# Altium PCB CH32L103C8T-R0.PcbDoc
Units mil, origin at the board's own origin, x right, y up, seen from the top; angles counter-clockwise.
Board outline 2283.48 x 2204.72 mil, 2 copper layers (Top Layer, Bottom Layer); 54 components, 62 nets, 247 pads, 390 vias.
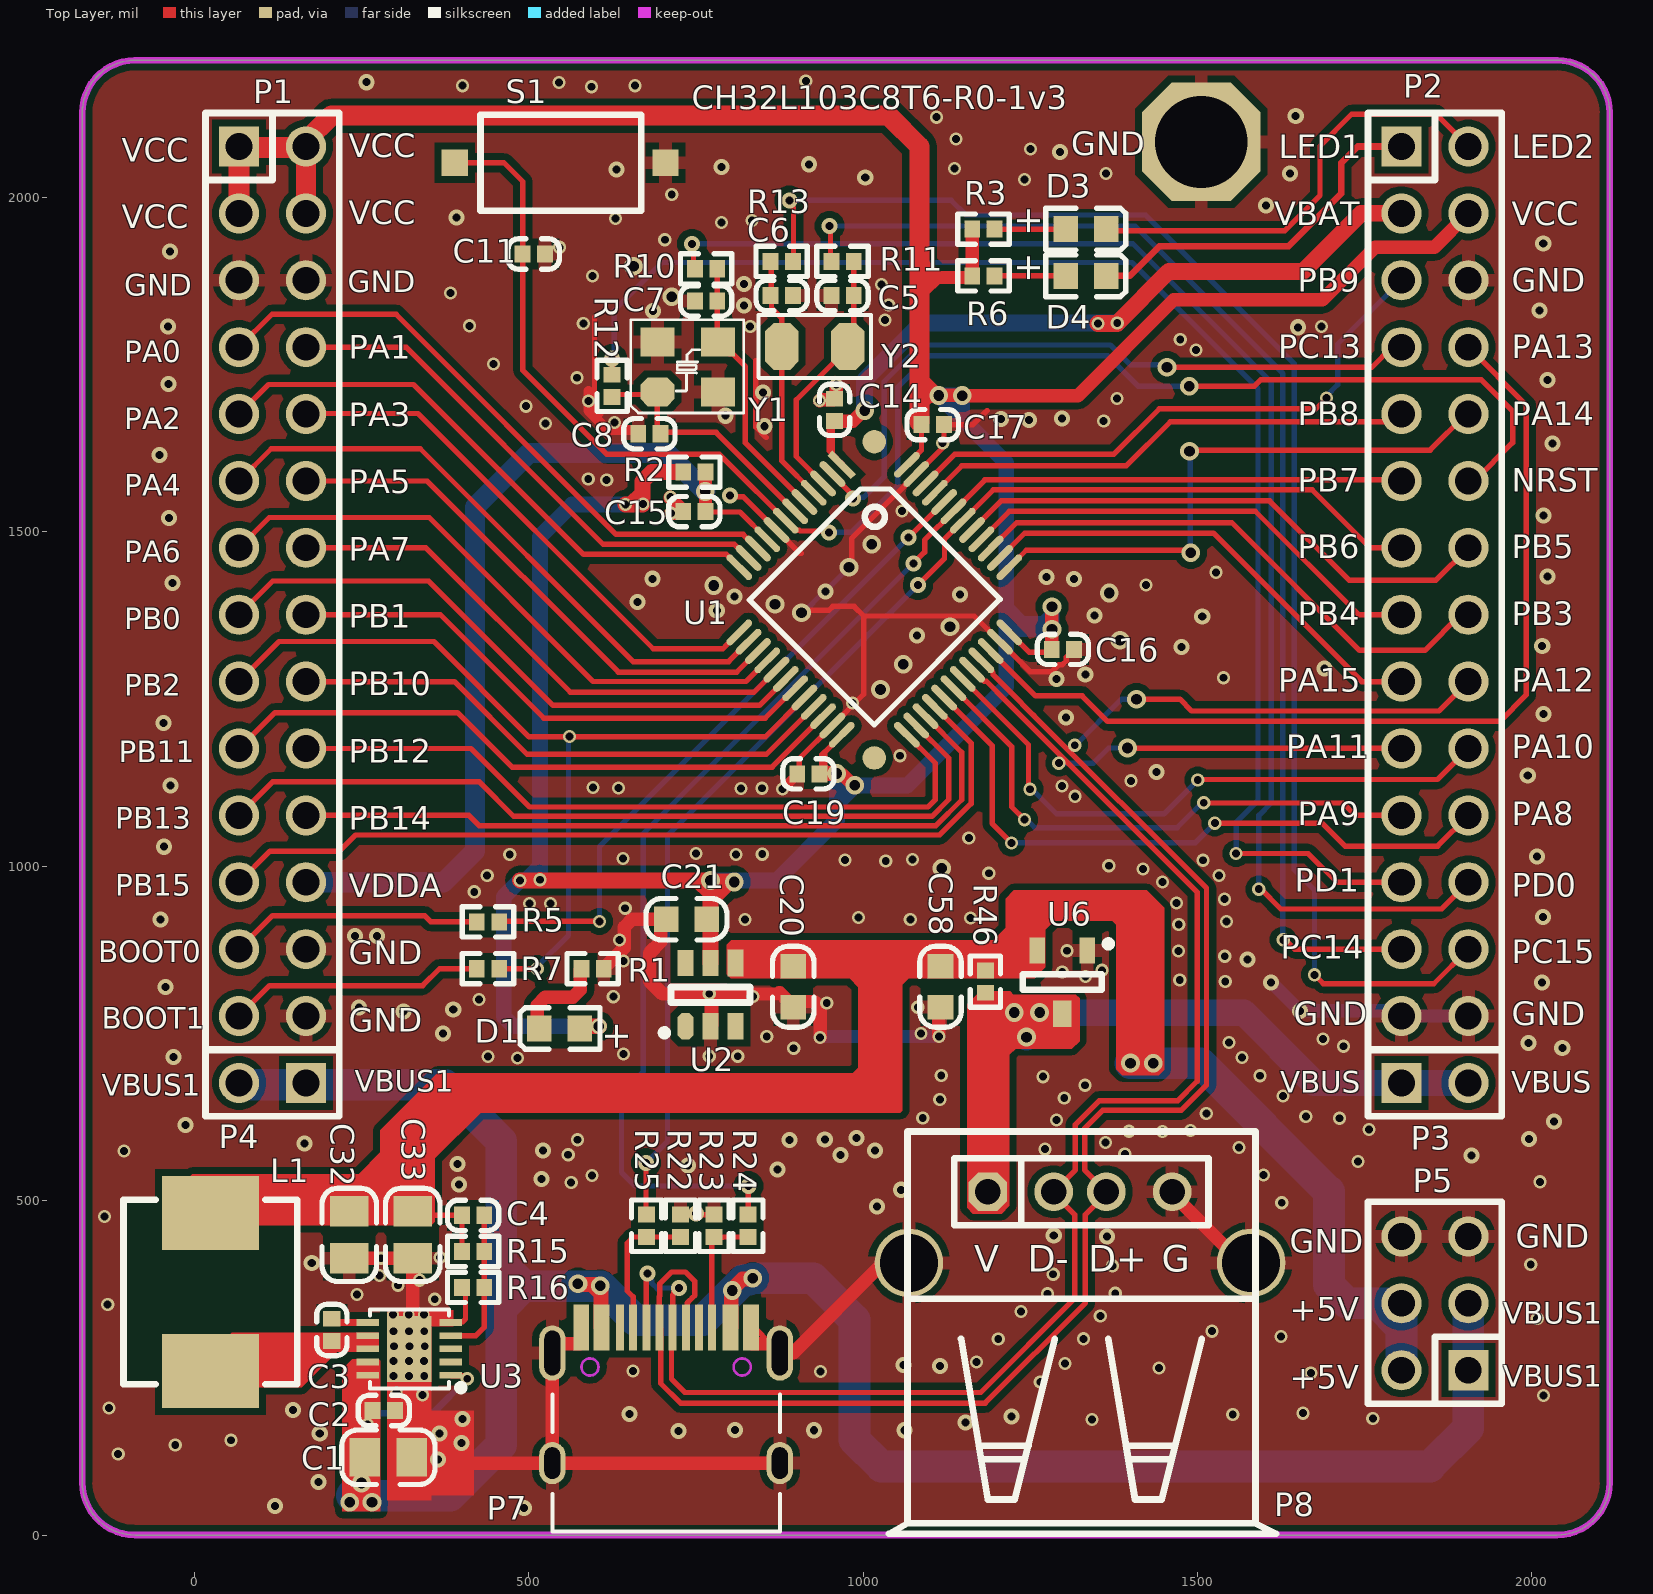
[diagram p0: Top Layer view]
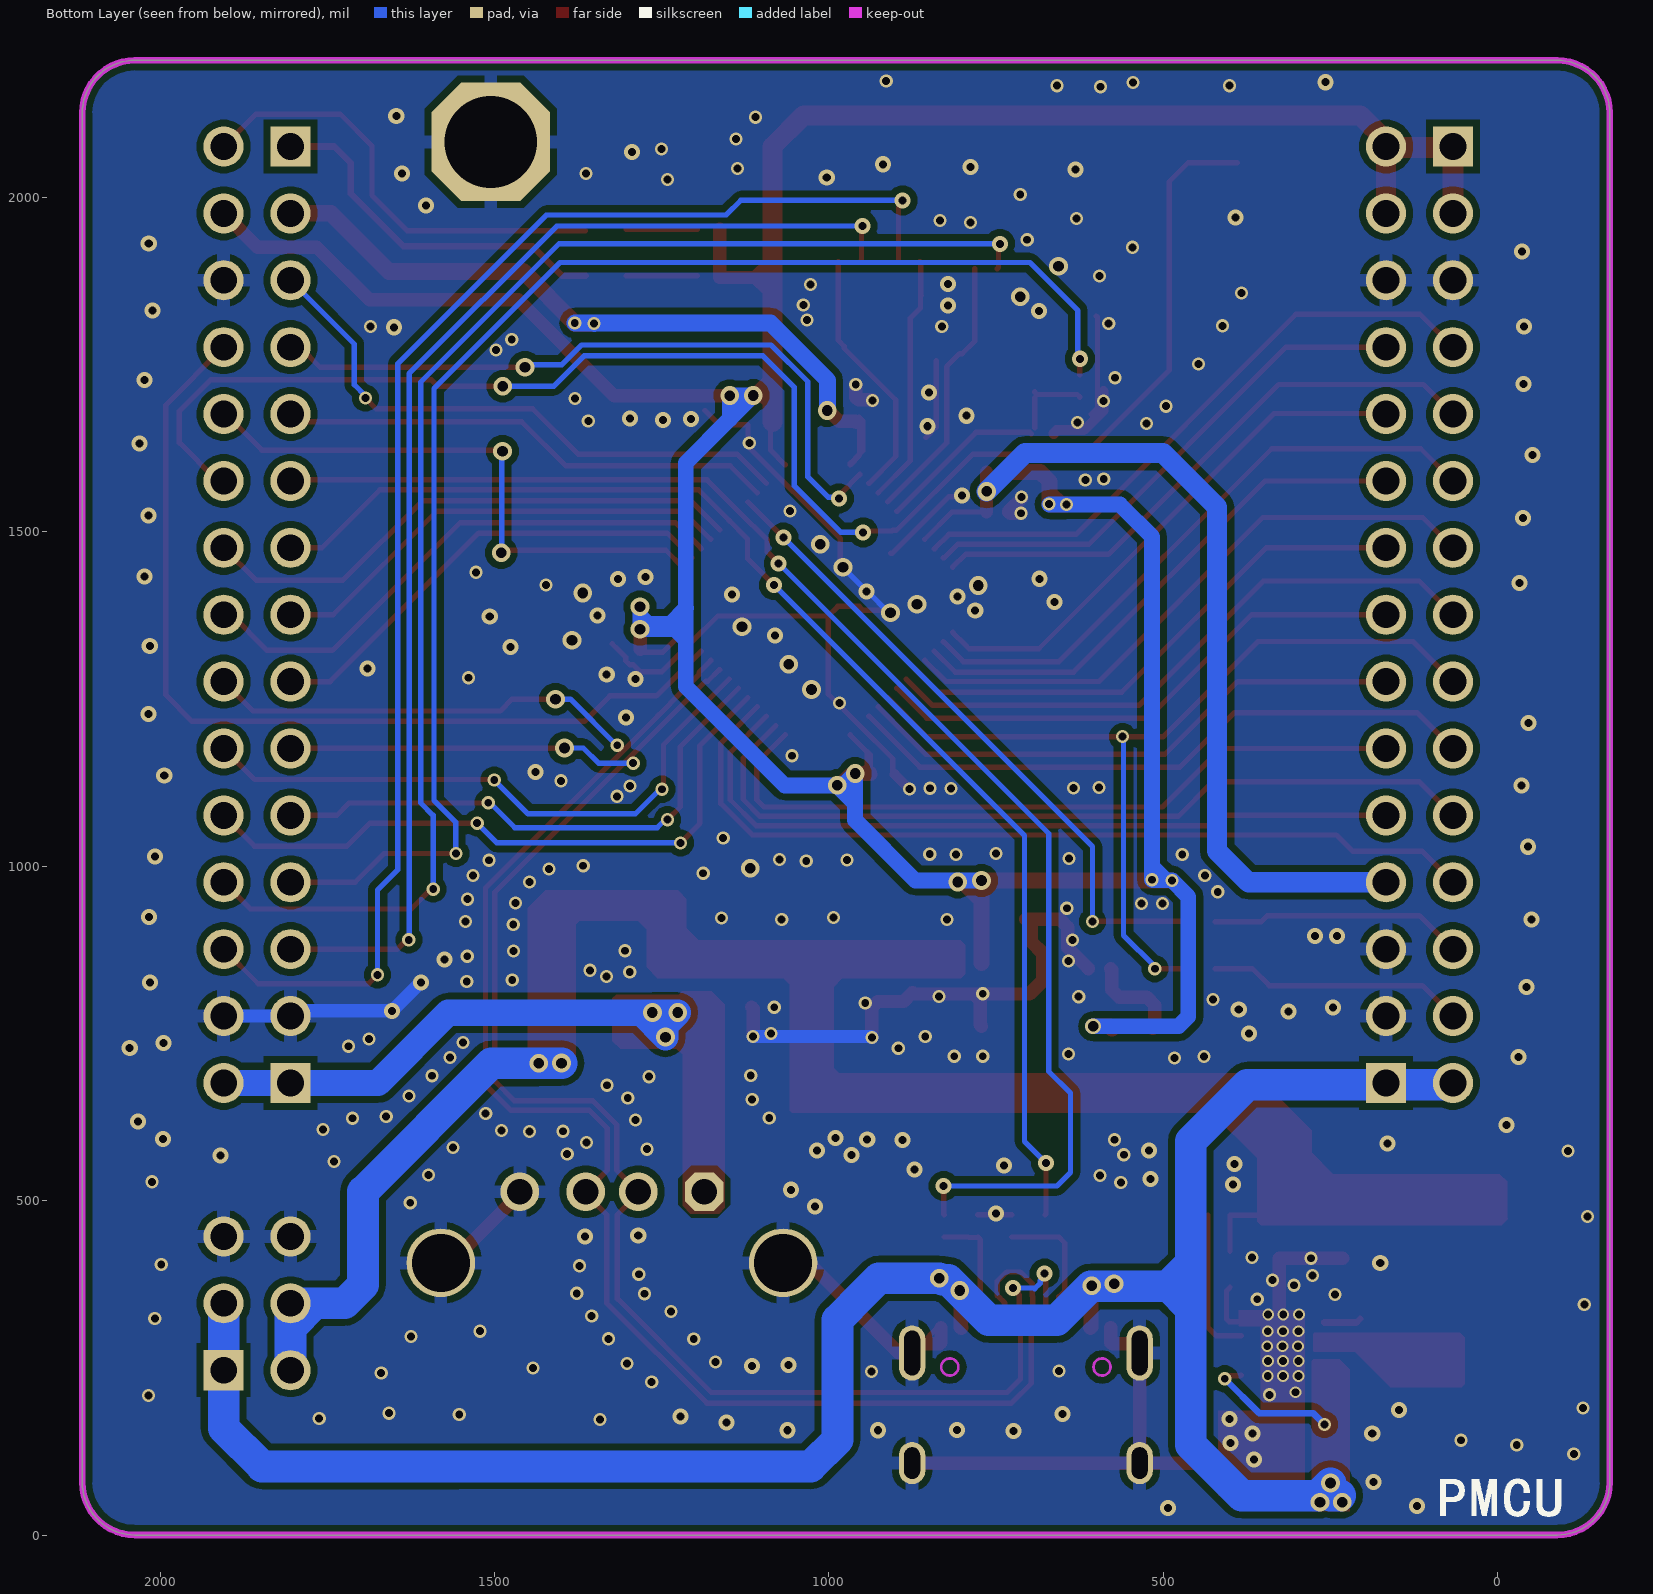
[diagram p1: Bottom Layer view, seen from below]

## Layer stack, top to bottom
Top Solder: solder mask 0.4, Solder Resist, Dk 3.5
Top Layer: signal copper 1.4
Dielectric1: dielectric 12.6, FR-4, Dk 4.8
Bottom Layer: signal copper 1.4
Bottom Solder: solder mask 0.4, Solder Resist, Dk 3.5

## Board outline
-88.46,0 cw(c-88.46,78.74) -167.21,78.74 -167.21,2125.98 cw(c-88.46,2125.98) -88.46,2204.72 2037.56,2204.72 cw(c2037.56,2126.01) 2116.27,2126.01 2116.27,2126.13 2116.27,78.74 cw(c2037.53,78.74) 2037.53,0

## Design rules (kind name [scope] priority, off if disabled: settings)
Clearance Clearance_1 [InPolygon] p1: gap=10 ignorepadtopadclearanceinfootprint=FALSE
Clearance [All] p2: gap=6 ignorepadtopadclearanceinfootprint=FALSE except(8: Arc-Via Track-Via SMDPad-Via THPad-Via Via-Via Via-Fill Via-Poly Via-Region Via-Hole)
ComponentClearance [All] p1 off: gap=10 collisioncheckmode=3 verticalgap=10 showdistances=FALSE
DiffPairsRouting [All] p1: maxlimit=10 minlimit=6 mostfreqgap=8 toplayer_minwidth=6 toplayer_maxwidth=15 toplayer_prefwidth=8 bottomlayer_minwidth=6 bottomlayer_maxwidth=15 bottomlayer_prefwidth=8 maxuncoupledlength=500
MinimumSolderMaskSliver [All] p1 off: minsoldermaskwidth=10
PolygonConnect PolygonConnect_1 [IsVia] p1: connectstyle=Direct reliefconductorwidth=10 reliefentries=4 polygonreliefangle="90 Angle" airgapwidth=10
PolygonConnect [All] p2: connectstyle=Relief reliefconductorwidth=20 reliefentries=4 polygonreliefangle="90 Angle" airgapwidth=10
RoutingVias [All] p1: holewidth=16 width=28 viastyle="Through Hole" minholewidth=11.81 minwidth=17.72 maxholewidth=28 maxwidth=50
SilkToSilkClearance [All] p1 off: silktosilkclearance=10
SilkToSolderMaskClearance [IsPad] p1 off: minsilkscreentomaskgap=10 clearancetoexposedcopper=TRUE
SolderMaskExpansion [All] p1: expansion=2 istentingtop=FALSE
Width [All] p1: maxlimit=100 minlimit=6 preferedwidth=10
25 further rules are at their usual default settings.

## Classes and differential pairs
differential pair PA11PA12: +PA11 -PA12

## Components (designator, comment, footprint, x,y, rotation, side; value= is the part's Value field where it differs from the comment)
C1 "NC(22uF/35V)" 0805_C 325.35,116.14 r180 top
C2 "NC(0.1uF)" 0402_C 300.32,186.16 r270 top
C3 "NC(100nF)" 0402_C 205.82,323.33 r0 top
C4 "NC(68pF)" 0402_C 400.4,478.05 r90 top
C5 "12pF" 0402_C 986.11,1853 r270 top
C6 "12pF" 0402_C 861.65,1853 r90 top
C7 "22pF" 0402_C 748.65,1845 r90 top
C8 "22pF" 0402_C 663.93,1646.4 r90 top
C11 "0.1uF" 0402_C 524.39,1915.12 r270 top
C14 "0.1uF" 0402_C 957.5,1665.34 r180 top value=15pF
C15 "0.1uF" 0402_C 764.57,1530 r270 top value=15pF
C16 "0.1uF" 0402_C 1282.12,1324.01 r90 top value=15pF
C17 "0.1uF" 0402_C 1120.94,1660 r270 top value=15pF
C19 "0.1uF" 0402_C 901.65,1138 r90 top value=15pF
C20 "10uF" 0603_C 895.59,789.38 r90 top
C21 "10uF" 0603_C 705.73,920.64 r0 top
C32 "NC(22uF)" 0805_C 231.96,413.82 r90 top
C33 "NC(22uF)" 0805_C 326.68,413.82 r90 top
C58 "10uF" 0603_C 1115.74,850.01 r270 top
D1 "RED" 0603+ 576.67,757.31 r180 top
D3 "LED2" 0603+ 1303.29,1952.38 r0 top
D4 "LED1" 0603+ 1303.29,1882.38 r0 top
L1 "NC(4.7uH)" IND-SMD_L7.0-W6.6 24.43,363.39 r90 top
P1 "HEADER 14x2" IDC28-2.54MM 67.11,2075.86 r0 top
P2 "HEADER 14x2" IDC28-2.54MM 1804.96,2075.87 r0 top
P3 "HEADER 2" SIP2-2.54mm 1804.96,675.87 r270 top
P4 "HEADER 2" SIP2-2.54mm 167.11,675.86 r90 top
P5 "HEADER 3x2" IDC6-2.54mm 1904.96,246.42 r90 top
P7 "TYPE-C" TYPE-C-Receptacle-2.0 705.59,310.26 r0 top
P8 "USB_A" USBAF 1186.59,513.26 r0 top
R1 "1K" 0402 578.99,846.6 r0 top
R2 "0Ω" 0402 731.11,1589 r0 top
R3 "1K" 0402 1163.29,1952.38 r0 top
R5 "10K" 0402 456,916.6 r180 top
R6 "1K" 0402 1163.29,1882.38 r0 top
R7 "10K" 0402 456,846.6 r180 top
R10 "NC(0Ω)" 0402 748.65,1893 r0 top
R11 "NC(0Ω)" 0402 952.65,1904 r0 top
R12 "NC(0Ω)" 0402 624.9,1734.7 r270 top
R13 "NC(0Ω)" 0402 895.11,1904 r180 top
R15 "NC(15K)" 0402 433.87,424.15 r180 top
R16 "NC(4.7K)" 0402 400.4,370.25 r0 top
R22 "5.1K" 0402 726.97,445.58 r90 top
R23 "5.1K" 0402 777.42,445.58 r90 top
R24 "0Ω" 0402 827.88,479.04 r270 top
R25 "0Ω" 0402 676.51,445.58 r90 top
R46 "NC(0Ω)" 0402 1182.86,844.12 r270 top
S1 "KEY" SMD_6.1x3.65x2.5mm-KEY 389.69,2051.61 r0 top
U1 "CH32L103C8T" LQFP48 968.11,1600 r225 top
U2 "CH2003K" SOT-23-6 734.54,760.67 r0 top
U3 "NC(CH2024Q)" DFN10_3X3 321.75,278.34 r90 top
U6 "CH213" SOT-23-3 1335.26,873.95 r180 top
Y1 "8M" XT3225 692.56,1709 r0 top
Y2 "32.768k" FC-135 977.11,1777 r180 top

## Footprints (in the part's own frame and the unit in brackets; to place one, negate y for a bottom-side part, rotate by r counter-clockwise, add the part's x,y. Pads: shape width x height; smd on the part's side, far side on the other; paste and mask are expansions set on the pad)
0402 [mm]
  rect 0.6x0.65 smd mask+0.051: 1(0,0) 2(0.85,0)
  silkscreen extent -0.55,-0.58 1.4,0.57
0402_C [mm]
  rect 0.65x0.6 smd mask+0.051: 1(0,0) 2(0,-0.85)
  silkscreen extent -0.58,-1.4 0.57,0.55
0603+ [mm]
  rect 0.93x0.98 smd: 1(0,0) 2(1.54,0)
  silkscreen extent -0.76,-0.79 2.27,0.79
0603_C [mm]
  rect 0.93x0.98 smd mask+0.051: 1(0,0) 2(1.54,0)
  silkscreen extent -0.76,-0.79 2.31,0.79
0805_C [mm]
  rect 1.16x1.47 smd mask+0.051: 1(0,0) 2(1.78,0)
  silkscreen extent -0.88,-1.04 2.66,1.03
DFN10_3X3 [mm]
  rect 2.5x1.7 smd mask+0.051: 0(0,0)
  rect 0.25x0.85 smd mask+0.051: 1(-1,-1.575) 2(-0.5,-1.575) 3(0,-1.575) 4(0.5,-1.575) 5(1,-1.575) 6(1,1.575) 7(0.5,1.575) 8(0,1.575) 9(-0.5,1.575) 10(-1,1.575)
  silkscreen extent -1.57,-2.05 1.5,1.5
FC-135 [mil]
  oct 50x70 smd: 1(0,0) 2(98.43,0)
  silkscreen extent -35,-47 133,47
IDC6-2.54mm [mil]
  rect 60x60 hole 40: 1(0,0)
  round 60 hole 40: 2(0,100) 3(100,0) 4(100,100) 5(200,0) 6(200,100)
  silkscreen extent -50,-50 252,150
IDC28-2.54MM [mil]
  rect 60x60 hole 40: 1(0,0)
  round 60 hole 40: 2(100,0) 3(0,-100) 4(100,-100) 5(0,-200) 6(100,-200) 7(0,-300) 8(100,-300) 9(0,-400) 10(100,-400) 11(0,-500) 12(100,-500) 13(0,-600) 14(100,-600) 15(0,-700) 16(100,-700) 17(0,-800) 18(100,-800) 19(0,-900) 20(100,-900) 21(0,-1000) 22(100,-1000) 23(0,-1100) 24(100,-1100) 25(0,-1200) 26(100,-1200) 27(0,-1300) 28(100,-1300)
  silkscreen extent -50,-1351 150,50
IND-SMD_L7.0-W6.6 [mm]
  rect 2.8x3.7 smd: 1(-3,0) 2(3,0)
  silkscreen extent -3.5,-3.3 3.5,3.3
LQFP48 [mm]
  round 0.889 smd: 0(-1.496,0.254) 0(6.996,8.746)
  rect 0.28x1.27 smd mask+0.051: 1(0,0)
  oval 0.28x1.27 smd mask+0.051: 2(0.5,0) 3(1,0) 4(1.5,0) 5(2,0) 6(2.5,0) 7(3,0) 8(3.5,0) 9(4,0) 10(4.5,0) 11(5,0) 12(5.5,0) 25(5.5,9) 26(5,9) 27(4.5,9) 28(4,9) 29(3.5,9) 30(3,9) 31(2.5,9) 32(2,9) 33(1.5,9) 34(1,9) 35(0.5,9) 36(0,9)
  oval 1.27x0.28 smd mask+0.051: 13(7.25,1.75) 14(7.25,2.25) 15(7.25,2.75) 16(7.25,3.25) 17(7.25,3.75) 18(7.25,4.25) 19(7.25,4.75) 20(7.25,5.25) 21(7.25,5.75) 22(7.25,6.25) 23(7.25,6.75) 24(7.25,7.25) 37(-1.75,7.25) 38(-1.75,6.75) 39(-1.75,6.25) 40(-1.75,5.75) 41(-1.75,5.25) 42(-1.75,4.75) 43(-1.75,4.25) 44(-1.75,3.75) 45(-1.75,3.25) 46(-1.75,2.75) 47(-1.75,2.25) 48(-1.75,1.75)
  silkscreen extent -0.65,1.15 6.11,7.86
SIP2-2.54mm [mil]
  rect 60x60 hole 40: 1(0,0)
  round 60 hole 40: 2(0,100)
  silkscreen extent -50,-50 50,150
SMD_6.1x3.65x2.5mm-KEY [mm]
  rect 1x1 smd: 1(0,0) 2(8,0)
  silkscreen extent 0.98,-1.83 7.08,1.83
SOT-23-3 [mm] "SOT-23-3"
  rect 0.6x1 smd: 1(0,0) 2(1.9,0)
  rect 0.7x1 smd: 3(0.95,2.4)
  silkscreen extent -0.93,-0.38 2.45,1.49
SOT-23-6 [mm] "SOT-23-6"
  oct 0.6x1 smd: 1(0,0)
  rect 0.6x1 smd: 2(0.95,0) 3(1.9,0) 5(0.95,2.4) 6(0,2.4)
  rect 0.6x1.04 smd: 4(1.9,2.4)
  silkscreen extent -0.93,-0.38 2.45,1.49
TYPE-C-Receptacle-2.0 [mm]
  oval 1x1.6 hole 0.6 slot 1.2 at 90 deg: 0(-4.32,-5.15) 0(4.32,-5.15)
  oval 1x2.1 hole 0.6 slot 1.7 at 90 deg: 0(-4.32,-0.97) 0(4.32,-0.97)
  rect 0.6x1.75 smd mask+0.051: A1(-3.225,0) A4(-2.45,0) B1(3.225,0) B4(2.45,0)
  rect 0.3x1.75 smd mask+0.051: A5(-1.25,0) A6(-0.25,0) A7(0.25,0) A8(1.25,0) B5(1.75,0) B6(0.75,0) B7(-0.75,0) B8(-1.75,0)
  Keep-Out Layer circle w0.1: c-2.89,-1.5 r0.325
  Keep-Out Layer circle w0.1: c2.89,-1.5 r0.325
  silkscreen extent -4.32,-7.75 4.32,-2.55
USBAF [mm]
  round 2.6 hole 2.2: 0(-3,-2.7) 0(10,-2.7)
  oct 1.473x1.473 hole 0.965: 1(0,0)
  round 1.473 hole 0.965: 2(2.5,0) 3(4.5,0) 4(7,0)
  silkscreen extent -3.75,-12.99 10.95,2.29
XT3225 [mm]
  oct 1.3x1.1 smd: 1(0,0)
  rect 1.3x1.1 smd: 2(2.3,0) 3(2.3,1.9) 4(0,1.9)
  silkscreen extent -1.02,-0.8 3.27,2.74

## Part data
C1 C4 C32 C33: library part "0603 100nF (104) 10% 50V", "贴片电容", Package=0603, SuppliersPartNumber=C14663, ComponentLink1Description=供应商链接, ComponentLink1URL=http://www.szlcsc.com/product/details_15331.html, Supplier=LC
C2 C20 C21 C58: library part CAP, "Capacitor"
C3: library part "0603 1uF (105) 10% 50V", "贴片电容", Package=0603, SuppliersPartNumber=C15849, ComponentLink1Description=供应商链接, ComponentLink1URL=http://www.szlcsc.com/product/details_16531.html, Supplier=LC
C5 C6 C7 C8 C11 C14 C15 C16 C17 C19: library part Cap, "Capacitor", LatestRevisionDate=17-Jul-2002, LatestRevisionNote="Re-released for DXP Platform.", PackageReference=RAD-0.3, Published=8-Jun-2000, Publisher="Altium Limited"
D1 D3 D4: library part LED0, "Typical INFRARED GaAs LED", LatestRevisionDate=08-Jul-2005, LatestRevisionNote="Mech Layer 1 removed.", PackageReference=LED-0, Published=8-Jun-2000, Publisher="Altium Limited"
  D1: PackageDescription="LED; 2 Leads"
L1: library part INDUCTOR
P1 P2: "Header, 14-Pin, Dual row"
P3 P4: "Header, 2-Pin"
P5: "Header, 3-Pin, Dual row"
P7: library part TYPE-C1
P8: library part USB, "USB Port"
R1 R15 R16 R46: library part RES
R2 R5 R7 R10 R11 R12 R13 R22 R23 R24 R25: library part Res2, "Resistor"
  R5 R7: LatestRevisionDate=17-Jul-2002, LatestRevisionNote="Re-released for DXP Platform.", PackageReference=AXIAL-0.4, Published=8-Jun-2000, Publisher="Altium Limited"
R3 R6: library part "Res Semi", "Semiconductor Resistor"
U1: "RISC-V LMD-MCU, 96MHz, USB, Type-C/PD, CAN, OPA, lower power"
U2: "Step-Down DC-DC Converter, 5V input, FB 0.6V, 800mA output, with LDO 3.3V * 200mA"
U3: library part CH2024Q, "Step-Down DC-DC Converter, 28V input, FB 1.2V, 3A output"
U6: library part CH213E, "Ideal Diode 5V*1A"
Y1 Y2: library part XTAL, "Crystal Oscillator", LatestRevisionDate=17-Jul-2002, LatestRevisionNote="Re-released for DXP Platform.", PackageReference=R38, Published=8-Jun-2000, Publisher="Altium Limited"

## Free pads (board coordinates)
  oct 177.17x177.17 hole 137.8: 0(1505.69,2082.66)

## Via types
v1: diameter 19.68, hole 11.81, Top Layer to Bottom Layer, tented both sides, 206 vias
v2: diameter 24, hole 12, Top Layer to Bottom Layer, tented both sides, 126 vias
v3: diameter 28, hole 16, Top Layer to Bottom Layer, tented both sides, 41 vias
v4: diameter 17.72, hole 11.81, Top Layer to Bottom Layer, tented both sides, 16 vias
v5: diameter 23.62, hole 15.75, Top Layer to Bottom Layer, tented both sides, 1 vias

## Nets (pads, with @x,y where several pads share a name; then routed paths per layer and width w, separated by ;. In a path a pad name is that pad's centre, name@x,y a point inside that pad or via, vN(x,y) a via of type N, cw(c..) or ccw(c..) an arc to the next point about the centre after c; other vN are vias at no path point)
3V3: C16.1 C17.2 C19.2 C21.2 D1.1 P1.1 P1.2 P1.3 P1.4 P2.4 R2.1 R3.1 R6.1 U1.24 U1.36 U1.48 U2.5 | length 6681.1
  Top Layer w8: C19.2@938.11,1140 938.11,1166.34 942.26,1170.48 ; C19.2@944.07,1136.96 943.67,1137.36 942.67,1138.37 942.67,1139.67 C19.2@942.67,1150.64 ; v3@950.91,1142.39 C19.2@942.67,1150.64 ; U1.24 968.11,1195.52 942.67,1170.07 C19.2@942.67,1150.64 ; U1.48 1087.48,1621.93 C17.2 ; U1.36 1248.11,1320 C16.1@1278.11,1320
  Top Layer w19.68: C19.2@937.08,1137.36 943.67,1137.36 959.62,1137.36 960.17,1136.81 969.5,1136.81 985.21,1121.11 v3(987.46,1121.11)
  Top Layer w20: P1.4 P1.4@177.93,1975.86 ; C19.2@938.11,1140 938.45,1139.67 942.67,1139.67 959.62,1139.67 v3(960.88,1138.41) ; 1086.63,1900.62 1089.5,1900.62 1110.12,1880 ; 1087.48,1694.9 1087.48,1706.65 ; 1087.48,1726.35 1087.48,1860.74 ; 1087.48,1880 1109.98,1880 ; 1089.13,1726.35 1110.22,1705.26 1111.52,1705.26 v3(1113.06,1703.73) ; 1090.72,1860.74 1109.98,1880 ; 1091.04,1694.9 1098.35,1702.2 1111.52,1702.2 v3(1113.06,1703.73) ; R6.1@1163.29,1880 1110.12,1880 ; R6.1 R3.1 ; v3@1282.11,1354 C16.1 1282.29,1324.18 1282.29,1388.1 v3@1282.49,1388.3 ; P2.4 1854.4,1925.31 1765.67,1925.31 1686.93,1846.56 1464.58,1846.56 1321.44,1703.43 v3(1148.13,1703.43) 1147.67,1703.88 1113.21,1703.88 v3(1113.06,1703.73) ; 1109.98,1880 1110.12,1880
  Top Layer w23.62: v1(487.25,978.75) 487.53,978.48 v1@518.13,978.48 ; v1(516.92,979.68) v1@518.13,978.48 ; D1.1 579.9,760.54 v5(605.07,760.54) ; R2.1 684.05,1589 670.21,1575.16 670.21,1557.92 ; 753.81,977.83 771.94,959.7 ; U2.5 771.94,948.4 ; v1@518.13,978.48 v3(771.98,978.48) ; v1@652.96,1540.67 670.21,1557.92 ; v1@652.96,1540.67 652.79,1540.5 v1(645.09,1540.5) 645.27,1540.67 v1@652.96,1540.67 ; v1@652.96,1540.67 670.21,1540.67 670.21,1557.92 ; 771.94,948.4 771.94,959.7 ; 771.94,948.4 799.76,976.22 v3(807.45,976.22) 806.61,977.05 774.59,977.05 773.16,978.48 v3(771.98,978.48) ; 771.94,959.7 771.94,978.44 v3(771.98,978.48)
  Top Layer w30: P1.4 P1.2 167.11,2083.98 205.04,2121.91 1038.38,2121.91 1084.41,2075.87 C17.2@1084.41,1663.76
  Top Layer w31.5: P1.1@65.69,2074.66 P1.1@67.11,2074.66 ; P1.3 P1.1@67.11,2074.66 ; P1.1 P1.1@67.11,2074.66 ; P1.2@165.69,2074.66 P1.1@67.11,2074.66
  Bottom Layer w20: P2.4 P2.4@1912.39,1968.44
  Bottom Layer w23.62: v5(605.07,760.54) 477.41,760.54 462.85,775.1 462.85,954.35 v1(487.25,978.75) v1@496.57,978.75 ; v1@670.21,1540.67 645.27,1540.67 v1(645.09,1540.5) 605.17,1540.5 604.99,1540.67 565.07,1540.67 516.92,1492.53 516.92,999.1 ; v3(771.98,978.48) v3@809.71,978.48 ; v3@808.88,977.65 809.47,977.05 810.9,978.48 870.79,978.48 960.88,1068.56 v3(960.88,1138.41) 961.8,1138.41 978.25,1121.95 986.16,1121.95 v3@987.46,1120.65 ; 962.78,1094.72 962.78,1095.25 987.46,1119.92 v3@987.46,1120.65 ; v3(987.46,1121.11) v3@987.46,1120.65 ; v3(1113.06,1703.73) v3@1113.21,1703.58 ; 1213.7,1386.1 1213.7,1385.87 1214.11,1385.47 ; 1224.64,1361.99 1237.59,1361.99 ; v3@1282.01,1356.63 1282.01,1373.6 ; v3@1282.11,1354 1230.11,1354 ; v3(1282.46,1387.88) 1282.01,1387.44 1282.01,1373.6 ; v1@496.57,978.75 516.92,999.1 ; v1@496.57,978.75 515.99,978.75 v1(516.92,979.68) 516.92,999.1 ; v3@987.46,1120.65 1066.17,1120.65 1214.11,1268.59 1214.11,1338 ; v3@1113.21,1703.58 1148.13,1668.65 ; v3@1113.21,1703.58 1147.98,1703.58 v3(1148.13,1703.43) 1148.13,1668.65 ; 1148.13,1668.65 1214.11,1602.68 1214.11,1385.47 ; 1214.11,1338 1230.11,1354 ; 1214.11,1338 1214.11,1370 ; 1214.11,1370 1230.11,1354 ; 1214.11,1370 1214.11,1385.47 ; 1214.11,1385.47 1237.59,1361.99 ; 1237.59,1361.99 1270.4,1361.99 1282.01,1373.6
  other v1: 670.83,1541.29
  other v3: 1282.46,1354
+5V: C4.1 C20.2 C32.2 C33.2 C58.1 L1.2 P5.2 P5.4 R15.2 R46.1 U2.4 U6.2 | length 2751.4
  Top Layer w6: C33.2 C33.2@332.54,478.05
  Top Layer w8: C33.2@332.54,478.05 C4.1 R15.2
  Top Layer w19.68: C32.2 C33.2 326.26,484.33 326.26,526.57 ; 325.83,527 326.26,526.57 ; U2.4 809.34,851.98 811.31,850.01 935.59,850.01 1015.74,850.01 ; 977.78,678.73 424.82,678.73 326.26,580.16 326.26,526.57 ; 1015.74,716.69 1015.74,850.01 ; 1147.92,853.33 1119.06,853.33 C58.1 1015.74,850.01 ; 1209.72,864.11 1258.48,864.11 1260.45,866.08 U6.2 1262.42,875.92 1262.42,924.41 1274.23,936.22 1382,936.22 1399.77,918.46 v3(1399.77,705.53)
  Bottom Layer w47.24: v3(1399.77,705.53) 1399.97,705.33 1433.69,705.33 v3(1433.89,705.12) 1505,705.12 1696.59,513.53 1696.59,374.09 1724.26,346.42 1768.78,346.42 ; P5.2 1804.96,310.24 ; 1768.78,346.42 P5.4 1804.96,310.24 ; 1768.78,346.42 1804.96,310.24
BOOT0: R5.1 U1.44 | length 990.6
  Top Layer w8: R5.1 456.77,917.37 v1(605.94,917.37) ; v2(1068.11,1491.21) U1.44
  Bottom Layer w8: v1(605.94,917.37) 605.94,1029.04 v2(1068.11,1491.21)
BOOT1: P1.17 R7.1 U1.20 | length 1377.3
  Top Layer w8: P1.17 127.05,1335.8 358.36,1335.8 500.81,1193.34 853.76,1193.34 U1.20 ; R7.1 v1(512.85,846.6)
  Bottom Layer w8: v1(512.85,846.6) 512.85,849.77 559.61,896.53 559.61,1192.26 v1(561.02,1193.66)
CC1: P2.13 R25.2 U1.42 | length 1945.3
  Top Layer w8: v2(675.56,556.36) 675.56,480 R25.2 ; v2(1082.11,1420) 1121.77,1459.66 1121.77,1489.19 U1.42 1149.06,1516.95 1194.84,1562.73 1671.43,1562.73 1758.3,1475.87 P2.13
  Bottom Layer w8: v2(675.56,556.36) 707.61,588.41 707.61,1045.5 v2(1082.11,1420)
CC2: P2.11 R24.1 U1.43 | length 2124.7
  Top Layer w8: R24.1 828.48,479.65 v2(828.48,521.81) ; v2(1075.11,1452.5) 1092.11,1469.5 1092.11,1487.37 U1.43 1182.13,1577.39 1803.52,1577.39 P2.11@1804.96,1578.83
  Bottom Layer w8: v2(828.48,521.81) 659.15,521.81 638.91,542.05 638.91,660.61 671.43,693.14 671.43,1048.82 v2(1075.11,1452.5)
FB: C4.2 R15.1 R16.2 U3.4 | length 222.7
  Top Layer w8: U3.4 421.12,298.03 433.87,310.77 R16.2 R15.1 C4.2
GND: C1.1 C2.1 C5.2 C6.2 C7.1 C8.1 C11.1 C14.2 C15.2 C16.2 C17.1 C19.1 C20.1 C21.1 C32.1 C33.1 C58.2 P1.5 P1.6 P1.26 P1.28 P2.6 P2.27 P2.28 P5.5 P5.6 P7.0 P7.A1 P7.B1 P8.0 P8.4 pad.0 R1.2 R16.1 R22.2 R23.2 S1.2 U1.8 U1.23 U1.35 U1.47 U2.2 U3.0 U3.5 U6.1 Y1.2 Y1.4 | length 4863.2
  Top Layer w8: U3.5 384.68,318.64 401.36,318.64 405.8,323.08 405.8,364.85 R16.1 ; P7.A1@573.7,310.26 P7.A1 ; 600.2,1822.31 598.6,1820.71 598.6,1685.11 608.29,1675.42 ; R22.2 R23.2 ; v2@805.86,1552.15 821.09,1552.15 U1.8 905.55,1467.69 907.94,1467.69 ; P7.B1 837.48,310.26 P7.0@861.93,285.81 ; 839.69,1755.76 839.69,1656.23 855.11,1640.81 ; C19.1@904.65,1140 904.65,1160.86 954.05,1210.26 U1.23 1001.11,1257.18 1001.11,1374 ; v3(908.07,1378.69) 911.9,1382.52 949.14,1382.52 954.95,1388.33 986.78,1388.33 1001.11,1374 ; v3(979.11,1446.89) 982.93,1450.72 982.93,1489.55 1120.94,1627.56 C17.1 1164.31,1660 1185.45,1681.14 ; C16.2@1323.96,1332.39 C16.2 1303.93,1312.36 1303.93,1307.08 1298.08,1301.22 1292.79,1301.22 1282.28,1290.71 1249.56,1290.71 U1.35 1166.27,1374 1001.11,1374
  Top Layer w15: 589.35,1710.03 589.35,1681.13 618.78,1651.7 659.61,1651.7 663.93,1647.39 C8.1 ; v1(879.83,1115.2) 901.65,1137.02 C19.1
  Top Layer w20: C32.1 C33.1 326.68,283.28 U3.0 333.65,266.44 333.65,203.71 ; C2.1 332.13,186.16 ; C1.1 C1.1@332.13,109.36 ; 332.13,203.71 332.13,186.16 ; P7.A1 578.62,287.62 576.81,285.81 544.46,285.81 535.51,276.86 535.51,272.07 P7.0@535.51,107.5 ; R1.2 612.46,847.59 642.93,878.06 642.93,908.92 654.64,920.64 C21.1 697.42,912.33 697.42,886.85 680.79,870.21 680.79,828.22 700.17,808.84 783.66,808.84 ; v1(711.96,1551.64) 711.96,1550.13 731.11,1530.98 C15.2 731.11,1529.3 729.3,1527.49 v1(712.76,1527.49) ; U2.2 773.75,762.49 773.75,798.94 783.66,808.84 ; P7.B1 832.56,287.62 834.37,285.81 P7.0@861.93,285.81 ; P7.0@875.67,107.5 P7.0@535.51,107.5 ; v1(935.02,1695.89) 936.13,1697 955.68,1697 C14.2 958.09,1698.81 959.9,1700.62 v1(959.9,1719.83) ; v1(935.86,743.96) 935.86,789.11 935.59,789.38 927.28,797.69 888.24,797.69 875.28,810.65 874.3,810.65 872.48,808.84 783.66,808.84 ; P8.0@1027.48,403.96 895.59,272.07 P7.0@875.67,272.07 ; v1(1113.38,745.24) 1113.38,787.02 C58.2 ; P8.4@1462.18,510.26 P8.0@1568.48,403.96 ; C1.1@332.13,109.36 332.13,186.16 ; C1.1@332.13,109.36 333.98,107.5 P7.0@535.51,107.5 ; P7.0@861.93,285.81 866.72,285.81 875.67,276.86 P7.0@875.67,272.07 ; P7.0@861.93,285.81 P7.0@875.67,272.07
  Bottom Layer w8: v3(908.07,1378.69) 910.12,1378.69 942.01,1410.58 v2(944.06,1410.58) 944.06,1411.21 979.11,1446.26 v3(979.11,1446.89)
  Bottom Layer w20: v1(935.86,743.96) 937.14,745.24 v1(1113.38,745.24) ; v2@1608.92,826.47 v2(1609.68,825.7) 1610.77,825.7 v2(1652.95,783.52) 1797.31,783.52 P2.27 P2.28
  other v1: -113.55,121.08 -28.23,134.81 55.13,141.68 1342.26,172.51 1762.1,174.44 1552.66,180.23 1657.86,182.16 -127.28,189.73 2017.42,208.6 341.56,209.62 1265.04,228.78 1669.45,242 936.44,244.32 656.28,245.39 1442.64,249.72 1302.18,256.2 1169.8,258.44 1202.14,293.05 1329.61,293.35 1625.05,297.01 1521.78,304.73 2007.84,323.61 1354.75,327.63 1236.06,334.2 -129.24,344.68 359.73,352.48 243.48,359.41 1275.94,360.79 1377.04,361.34 304.97,373.49 336.68,380.99 277.27,388.04 1284.25,389.86 1373.04,402.49 1998.25,404.53 279.32,413.82 367.56,414.82 -134.14,476.1 1626.01,496.79 563.69,527.16 2012.09,528.06 594.61,537.64 1598.91,538.17 1739.9,558.56 559.2,568.56 1391.34,569.81 -104.72,574.17 1272.19,576.84 1562.1,579.17 1362.63,586.75 573.17,591.01 1397.66,603.69 1447.91,603.4 1489.44,604.96 1756.61,606.36 1289.19,620.4 1712.49,623.09 1089.21,623.48 1661.98,625.83 1513.18,630.28 1114.77,651.22 1300.87,653.33 1627.9,656.56 1331.68,672.45 1269.17,685.25 1116.95,687.1 1593.29,686.57 483.25,713.1 1566.46,714.02 439.48,715.37 770.12,715.84 812.65,715.84 641.75,719.14 896.31,727.7 1718.53,730.68 1547.36,736.55 1687.8,741.37 856.05,745.33 1086.65,750.01 1081.77,789.05 945.79,795.44 425.89,800.65 626.66,804.8 835.66,805.09 770.12,809.27 1541.56,827.62 1473.51,829.69 1332.39,835.18 1297.9,841.88 1357.07,844.27 641.75,858.39 1540.73,865.24 1305.08,873.5 1471.39,873.25 635.71,889.34 1471.92,912.56 1543.21,917.31 823.45,920.21 1070.69,920.21 1160.79,922.3 993.16,923.35 644.41,937.02 532.96,944.02 501.53,944.2 1468.84,944.9 1540.36,950.57 418.82,961.62 1447.6,976.15 1532.32,985.83 438.12,986.22 1188.02,989.35 1418.35,995.79 1367.46,1000.59 1034.02,1007.69 1508.2,1008.72 973.26,1009.26 1073.83,1009.78 641.38,1011.21 471.81,1017.26 810.28,1017.5 849.36,1017.85 750.46,1018.88 1158.17,1042.26 1317.12,1104.37 817.36,1115.96 634.22,1117.04 848.81,1116.49 596.2,1117.62 1297.5,1119.93 1400.52,1127.55 1055.25,1164.97 984.26,1243.88 1539,1281.65 1423.06,1420.39 1527.93,1439.27 1058.37,1530.85 616.77,1577.08 589.19,1578.55 1119.09,1632.72 525.5,1661.52 628.62,1663.23 1359.75,1665.53 495.97,1687.64 589.35,1695.58 1379.81,1699.09 572.38,1730.14 447.69,1750.75 1497.62,1771.78 1474.3,1787.33 831.29,1806.83 1685.47,1806.8 411.59,1807.77 581.83,1811.11 1032.96,1816.44 1038.37,1838.86 383.34,1856.94 1027.54,1869.41 595.6,1882.01 546.21,1925.12 703.68,1936.4 788.31,1962.19 833.77,1965.3 630.02,1968.07 714.01,2003.86 1241.28,2026.45 1363.12,2035.24 1136.68,2043.1 1250.3,2072.24 1138.75,2087.16 1109.66,2119.66 593.95,2165.23 401.03,2166.75 659.27,2166.75 545.34,2171.31 914.46,2173.59
  other v2: 493.21,40.43 120.62,43.1 185.8,79.18 364.58,112.81 399.68,137.25 187.79,151.5 366.72,151.78 723.96,155.4 808.81,156.75 926.51,156.65 1062.08,156.65 1153.3,168.2 401.44,173.6 1221.83,177.02 650.55,181 147.89,186.91 1115.36,252.8 1060.77,254.39 175.82,406.88 1364.97,445.97 1285.1,447.66 750.04,480.79 1021.21,491.25 1056.49,516.15 396.29,524.1 519.48,532.08 872.41,546.26 738.03,552.2 393.79,554.52 1909.71,567.56 966.22,568.33 521.48,574.97 1017.65,574.78 165.24,585.53 890.22,590.9 942.8,591.48 1995.49,591.76 989.92,593.69 -13.18,612.91 2032.89,618.15 -30.97,714.91 2045.35,728.13 1994.76,735.46 371.73,749.61 312.76,782.84 387.36,785.39 246.39,788.41 -43.04,819.5 2015.25,825.89 1575,860.65 240.71,895.48 273.34,895.48 -50.13,920.51 2016.46,923.66 2007.86,1014.57 -44.91,1029 -35.37,1120.36 1993.72,1135.57 1438.72,1140.83 -45.75,1213.77 1303.63,1222.29 2017.07,1227.65 1289.4,1279.62 1332.24,1286.24 1689.75,1295.33 1476.22,1327.72 2015.4,1329.36 1080.94,1344.59 1507.11,1373.28 1346.24,1374.52 781.33,1382.08 663.16,1395.15 808.09,1403.33 1145.01,1406.34 -32.18,1423.17 1315.39,1429.03 685.07,1429.61 1274.21,1432.43 2022.99,1433.14 -37.35,1520.35 2017.12,1523.86 800.84,1554.14 -51.83,1614.43 2031.01,1631.67 852.77,1657.61 1248.36,1666.65 1206.19,1668.78 1297.22,1669.28 794.12,1673.35 850.77,1708.01 -38.39,1720.91 2023.18,1726.47 1650.09,1805.6 -38.97,1806.65 685.85,1830.15 2011.43,1830.67 822.18,1838.09 822.18,1870.46 -36.14,1918.92 2016.91,1930.95 392.11,1970.02 1602.15,1987.46 1003.3,2029.26 1638.06,2035.35 631.46,2041.36 788.32,2045.39 918.99,2049.28 1294.14,2067.89 1646.88,2121.26 257.96,2171.93
  other v3: 1117.84,996.72 1026.11,1264 1060.11,1302 1384.04,1337.66 1130.11,1358 868.29,1391.32 1368.17,1408.42 776.81,1419.6 1013.2,1481.3 714.17,1851.41 656.89,1896.82
  other v4: 302.46,213.43 297.94,237.59 321.44,237.59 343.97,237.59 297.76,260.17 321.25,260.17 343.79,260.17 298.68,282.21 322.17,282.21 344.71,282.21 297.94,304.63 321.44,304.63 343.97,304.63 297.32,329.5 320.82,329.5 343.36,329.5
LED1: D4.2 P2.1 | length 548
  Top Layer w10: D4.2 1398.71,1882.38 1442.95,1926.63 1636.06,1926.63 1714.84,2005.41 1714.84,2051.19 1739.51,2075.87 P2.1
LED2: D3.2 P2.2 | length 676.7
  Top Layer w8: D3.2@1363.92,1950 1630.6,1950 1683.12,2002.52 1683.12,2076.67 1730.67,2124.21 1856.61,2124.21 P2.2
NetC3_1: C3.1 U3.6 | length 56.3
  Top Layer w10: C3.1 211.36,317.79 259.66,317.79 U3.6
NetC3_2: C3.2 L1.1 U3.7 U3.8
NetD1_2: D1.2 R1.1 | length 142.1
  Top Layer w20: D1.2 512.85,760.5 512.85,792.02 524.56,803.73 565.75,803.73 577.47,815.45 577.47,845.08 R1.1
NetD3_1: D3.1 R3.2 | length 106.5
  Top Layer w8: R3.2 D3.1
NetD4_1: D4.1 R6.2 | length 106.5
  Top Layer w8: R6.2 D4.1
NetP1_25: P1.25 R5.2 | length 380
  Top Layer w8: P1.25 117.14,925.89 344.64,925.89 353.92,916.6 R5.2
NetP1_27: P1.27 R7.2 | length 384.7
  Top Layer w8: P1.27 112.61,821.36 341.56,821.36 366.8,846.6 R7.2
NetP7_A5: P7.A5 R22.1 R25.1 | length 213.2
  Top Layer w8: P7.A5 656.38,356.2 647.51,365.07 647.51,436.56 656.41,445.46 676.39,445.46 R25.1 R22.1
NetP7_B5: P7.B5 R23.1 R24.2 | length 187.2
  Top Layer w8: P7.B5 773.66,311.09 773.66,441.81 R23.1 ; R23.1@778.17,444.83 790.74,444.83 791.49,445.58 R24.2
NRST: C11.2 P2.12 S1.1 U1.7 | length 2350.7
  Top Layer w8: S1.1 462.92,2051.61 491.4,2023.13 491.4,1915.12 491.4,1741.17 616.97,1615.61 785.46,1615.61 898.95,1502.12 904.85,1502.12 905.87,1501.11 946.67,1501.11 v2(948.8,1498.98) ; v3(1487.64,1717.55) 1584.97,1717.55 1594.49,1727.07 1924.51,1727.07 1971.11,1680.47 1971.11,1633.13 1913.85,1575.87 P2.12
  Bottom Layer w8: v2(948.8,1498.98) 982.23,1498.98 1052.15,1568.91 1052.15,1716.28 1099.15,1763.27 1365.67,1763.27 1411.39,1717.55 v3(1487.64,1717.55)
OSCI: C5.1 R11.2 U1.3 Y2.1 | length 384.1
  Top Layer w8: U1.3 900.11,1612.32 900.11,1697 977.11,1774 Y2.1 985.86,1785.75 985.86,1852.75 C5.1 R11.2
OSCO: C6.1 R13.2 U1.4 Y2.2 | length 373.6
  Top Layer w8: R13.2@864.11,1904 862.88,1902.77 862.88,1854.23 C6.1 863.06,1851.59 863.06,1834.6 878.69,1818.98 Y2.2 878.69,1605.91 U1.4
PA0: P1.7 U1.10 | length 941.2
  Top Layer w8: P1.7 116.3,1825.05 301.96,1825.05 630.95,1496.05 820.69,1496.05 842.02,1474.73 U1.10
PA1: P1.8 U1.11 | length 792.3
  Top Layer w8: P1.8 316.86,1775.86 611.6,1481.12 807.79,1481.12 828.1,1460.81 U1.11
PA2: P1.9 U1.12 | length 879.4
  Top Layer w8: P1.9 111.36,1720.1 327.92,1720.1 582.03,1466 795.88,1466 U1.12
PA3: P1.10 U1.13 | length 804
  Top Layer w8: P1.10 167.96,1676.7 334.62,1676.7 686.33,1325 790.55,1325 796.83,1331.28 U1.13
PA4: P1.11 U1.14 | length 926
  Top Layer w8: P1.11 115.27,1624.02 337.99,1624.02 656.39,1305.63 799.01,1305.63 U1.14
PA5: P1.12 U1.15 | length 807.2
  Top Layer w8: P1.12 348.43,1575.86 634.29,1290 811.22,1290 U1.15
PA6: P1.13 U1.16 | length 923
  Top Layer w8: P1.13 112.34,1521.09 351.51,1521.09 596.6,1276 825.06,1276 U1.16
PA7: P1.14 U1.17 | length 807
  Top Layer w8: P1.14 346.51,1475.86 562.37,1260 836.9,1260 U1.17
PA8: P2.22 U1.29 | length 987.4
  Top Layer w8: U1.29 1192.96,1180.27 1192.96,1063.69 v1(1221.86,1034.79) ; v1(1525.93,1064.19) 1686.44,1064.19 1720.67,1029.96 1859.05,1029.96 P2.22
  Bottom Layer w8: v1(1221.86,1034.79) 1496.53,1034.79 v1(1525.93,1064.19)
PA9: P2.21 U1.30 | length 832.3
  Top Layer w8: U1.30 1222.27,1178.81 1222.27,1088.75 v1(1241.6,1069.42) ; v1(1509.42,1094.8) 1509.73,1094.48 1717.26,1094.48 1735.88,1075.87 P2.21
  Bottom Layer w8: v1(1241.6,1069.42) 1244.76,1069.42 1256.84,1057.34 1469.52,1057.34 1506.97,1094.8 v1(1509.42,1094.8)
PA10: P2.20 U1.31 | length 917.6
  Top Layer w8: U1.31 1247.42,1181.5 1247.42,1117.17 v1(1249.65,1114.93) ; v1(1500.47,1128.96) 1501.05,1129.54 1858.64,1129.54 P2.20
  Bottom Layer w8: v1(1249.65,1114.93) 1252.81,1114.93 1289.63,1078.12 1449.62,1078.12 v1(1500.47,1128.96)
PA11: P2.19 P7.A7 P7.B7 P8.2 U1.32 | length 2725.9
  Top Layer w8: P7.B7 675.79,310.53 675.79,389.22 v2(677.57,391) ; v2(724.59,369.26) 723.41,369.26 722.41,368.26 722.23,368.43 716.59,362.79 716.59,359.69 715.43,358.53 P7.A7 713.59,308.42 713.59,233.19 733.68,213.1 1176,213.1 1316.39,353.49 1316.39,478.89 P8.2@1285.02,510.26 ; U1.32 1163.8,1293.77 1181.17,1276.4 1184.37,1276.4 1213.94,1246.83 1249.87,1210.91 1499.55,961.22 1499.55,678.42 1470.3,649.17 1352.74,649.17 1317.39,613.82 1317.39,545.63 P8.2 ; v3(1395.32,1176.66) 1395.72,1176.27 1804.56,1176.27 P2.19
  Bottom Layer w8: v2(677.57,391) 677.57,386.67 684.26,379.98 684.26,376.31 692.31,368.26 693.31,369.26 v2(724.59,369.26) ; v1(1292.69,1153.91) 1344.57,1153.91 1367.32,1176.66 v3(1395.32,1176.66)
PA12: P2.18 P7.A6 P7.B6 P8.3 U1.33 | length 2910.4
  Top Layer w8: P7.B6 737.02,312.17 737.02,346.75 738.9,348.63 738.9,348.85 744.76,354.71 744.98,354.71 748.59,358.32 748.59,379.2 734.53,393.26 713.65,393.26 695.92,375.53 695.92,357.51 695.12,356.71 695.12,310.89 P7.A6 697.59,308.42 697.59,226.56 727.06,197.1 1182.63,197.1 1332.39,346.86 1332.39,478.89 P8.3@1363.76,510.26 ; U1.33 1176.9,1306.87 1194.27,1289.5 1194.27,1286.3 1219.74,1260.83 1255.11,1225.46 1513.55,967.02 1513.55,672.62 1476.1,635.17 1358.54,635.17 1331.39,608.02 1331.39,545.63 P8.3 ; v3(1408.88,1249.57) 1473.59,1249.57 1491.27,1231.89 1860.98,1231.89 P2.18
  Bottom Layer w8: v1(1316.45,1180.72) 1317.49,1180.72 1386.34,1249.57 v3(1408.88,1249.57)
PA13: P2.8 U1.34 | length 1416.2
  Top Layer w8: U1.34 1257.79,1254.64 1327.55,1254.64 1365.67,1216.52 1952.1,1216.52 1991.4,1255.82 1991.4,1689.43 P2.8
PA14: P2.10 U1.37 | length 881.7
  Top Layer w8: U1.37 1244.06,1472.28 1486.08,1472.28 v3(1489.91,1468.46) ; v3(1488.12,1620.29) 1489.64,1621.81 1847.79,1621.81 1901.84,1675.87 P2.10 ; P2.10@1899.03,1655.87 P2.10@1904.96,1655.87
  Bottom Layer w8: v3(1488.12,1620.29) 1489.01,1619.39 1489.01,1469.35 v3(1489.91,1468.46)
PA15: P2.17 U1.38 | length 707.5
  Top Layer w8: U1.38 1241.75,1497.81 1523.89,1497.81 1745.84,1275.87 P2.17
PB0: P1.15 U1.18 | length 931.7
  Top Layer w8: P1.15 117.49,1426.24 350.63,1426.24 536.49,1240.38 845.12,1240.38 U1.18
PB1: P1.16 U1.19 | length 813.9
  Top Layer w8: P1.16 368.11,1375.86 522.7,1221.27 853.85,1221.27 U1.19
PB3: P2.16 U1.39 | length 831.2
  Top Layer w8: U1.39 1229.43,1513.33 1551.57,1513.33 1742.34,1322.56 1840.19,1322.56 1893.5,1375.87 P2.16
PB4: P2.15 U1.40 | length 709.5
  Top Layer w8: U1.40 1218.77,1530.52 1586.4,1530.52 1741.05,1375.87 P2.15
PB5: P2.14 U1.41 | length 829.2
  Top Layer w8: U1.41 1206.47,1546.05 1607.89,1546.05 1726.47,1427.47 1856.56,1427.47 P2.14
PB8: P2.9 U1.45 | length 750.3
  Top Layer w8: U1.45 1147.54,1598.47 1393.44,1598.47 1459.34,1664.38 P2.9@1804.96,1664.38 ; P2.9@1796.32,1675.87 P2.9
PB9: P2.5 U1.46 | length 874.9
  Top Layer w8: U1.46 1137.17,1615.95 1375.07,1615.95 1442.9,1683.79 1676.97,1683.79 v1(1692.93,1699.75)
  Bottom Layer w8: v1(1692.93,1699.75) 1692.93,1702.91 1709.74,1719.73 1709.74,1780.65 P2.5
PB10: P1.18 U1.21 | length 833.6
  Top Layer w8: P1.18 389.17,1275.86 497.75,1167.27 855.53,1167.27 U1.21
PB11: P1.19 U1.22 | length 960.8
  Top Layer w8: P1.19 120.82,1229.56 393.72,1229.56 475.32,1147.96 864.05,1147.96 U1.22
PB12: P1.20 U1.25 | length 1096.3
  Top Layer w8: P1.20 413.99,1175.86 501.35,1088.51 1097.22,1088.51 1108.11,1099.4 1108.11,1153.77 U1.25
PB13: P1.21 U1.26 | length 1244.3
  Top Layer w8: P1.21 117.2,1125.94 426.37,1125.94 477.81,1074.51 1103.02,1074.51 1128.11,1099.6 1128.11,1161.61 U1.26
PB14: P1.22 U1.27 | length 1150.2
  Top Layer w8: P1.22 410.77,1075.86 426.12,1060.51 1108.82,1060.51 1147.56,1099.25 1147.56,1170 U1.27
PB15: P1.23 U1.28 | length 1310.3
  Top Layer w8: P1.23 113.58,1022.32 217.04,1022.32 241.22,1046.51 1114.62,1046.51 1161.56,1093.45 1161.56,1183.84 U1.28
PC13: P2.7 U1.2 | length 1073.5
  Top Layer w8: U1.2 954.19,1585.26 982.17,1557.28 982.17,1552.85 v2(985.23,1549.79) ; v3(1454.36,1745.84) 1760.86,1745.84 1790.89,1775.87 P2.7
  Bottom Layer w8: v2(985.23,1549.79) 986.97,1551.53 1001.44,1551.53 1031.65,1581.74 1031.65,1724.16 1086.63,1779.14 1369.88,1779.14 1399.37,1749.66 1450.53,1749.66 v3(1454.36,1745.84)
PC14: P2.25 R11.1 | length 1861.9
  Top Layer w8: v2(949.93,1957.09) 951.29,1955.73 951.29,1905.36 R11.1 ; v1(1628.17,889.86) 1631.33,889.86 1645.33,875.87 P2.25 P2.25@1804.96,885.23
  Bottom Layer w8: v2(949.93,1957.09) 1406.77,1957.09 1627.59,1736.27 1627.59,890.44 v1(1628.17,889.86)
PC15: P2.26 R13.1 | length 2131.6
  Top Layer w8: v2(889.88,1995.3) 889.88,1990.97 896.1,1984.75 R13.1@896.1,1905.48 ; v1(1674.85,837.53) 1688.25,824.14 1853.23,824.14 P2.26
  Bottom Layer w8: v2(889.88,1995.3) 1131.83,1995.3 1153.73,1973.4 1422.48,1973.4 1644.44,1751.44 1644.44,994.82 1674.85,964.4 v1(1674.85,837.53)
PD0: P2.24 R10.1 | length 2098.8
  Top Layer w8: v2(744.32,1930.4) 746.48,1928.24 746.48,1895.16 R10.1 ; v1(1591.65,965.53) 1594.81,965.53 1624.48,935.87 1662.95,935.87 1864.96,935.87 P2.24
  Bottom Layer w8: v2(744.32,1930.4) 1403.5,1930.4 1610.32,1723.59 1610.32,1094.5 1591.65,1075.84 v1(1591.65,965.53)
PD1: P2.23 R12.1 | length 2148.1
  Top Layer w8: v2@619.91,1763.49 v2(624.9,1758.49) R12.1 ; v1(1557.7,1018.89) 1665.44,1018.89 1708.46,975.87 P2.23
  Bottom Layer w8: v2(624.9,1758.49) 627.97,1761.55 627.97,1830.58 699.76,1902.38 1402.01,1902.38 1590.36,1714.02 1590.36,1098.09 1557.7,1065.43 v1(1557.7,1018.89)
VBAT: C14.1 P2.3 U1.1 | length 1186.1
  Top Layer w8: C14.1@954.64,1671 949.11,1665.46 949.11,1621.14 U1.1@954.33,1615.92 ; C14.1 954.33,1662.18 U1.1@954.33,1615.92 ; U1.1@954.33,1615.92 954.33,1613.78 U1.1 968.11,1602.14 U1.1@954.33,1615.92
  Top Layer w20: C14.1@959.22,1663.61 959.22,1664.14 960.29,1665.21 984.67,1665.21 1000.49,1681.03 v3(1002.66,1681.03)
  Top Layer w25: v1(1351.05,1811.12) 1351.28,1811.35 1379.52,1811.35 1457.01,1888.84 1657.58,1888.84 1744.6,1975.87 P2.3
  Bottom Layer w25: v3(1002.66,1681.03) 1002.09,1681.61 1002.09,1726.42 1087.49,1811.82 1350.35,1811.82 v1(1351.05,1811.12) 1351.75,1811.82 v1(1379.98,1811.82)
VBUS: P3.1 P3.2 P8.1 R46.2 U6.3 | length 1188.1
  Top Layer w30: P8.1 1186.59,763.49 1204.16,781.07 v3(1263.98,781.07) 1296.63,781.07 1297.85,779.85 U6.3
  Bottom Layer w39.37: P3.2 P3.1 1674.16,675.87 1569.37,780.65 1280.72,780.65 ; 1280.72,780.65 v3(1244.46,744.39) 1244.46,762.58 v3(1225.88,781.16) 1263.9,781.16 v3(1263.98,781.07) 1264.4,780.65 1280.72,780.65
VBUS1: C1.2 C2.2 P4.1 P4.2 P5.1 P5.3 P7.A4 P7.B4 U3.1 U3.9 U3.10 | length 3612.9
  Top Layer w8: U3.1 384.68,238.05 400.73,238.05 405.15,233.63 v1(408.31,233.63)
  Top Layer w22: C1.2@255.27,110.14 263.67,101.74 263.67,47.23 v3@264.82,46.09 ; v3(573.72,375.7) 574.87,374.55 600.08,374.55 v3@608.32,366.3 ; v3@594.18,373.89 v3@608.32,359.75 ; v3(607.2,372.71) 608.32,371.59 v3@608.32,366.3 ; P7.A4 608.32,311.07 v3@608.32,359.75 ; P7.B4 802.86,311.07 802.86,362.49 804.31,363.94 v3(804.31,365.56) 804.31,367.19 819.94,382.82 834.05,382.82 v3(835.2,383.97) ; v3@608.32,359.75 v3@608.32,366.3
  Bottom Layer w10: v1(259.32,165.26) 276.27,182.21 356.88,182.21 v1(408.31,233.63)
  Bottom Layer w47.24: P4.2 69.55,673.42 374.51,673.42 459.12,588.81 459.12,406.04 ; v3@235.59,59.09 250.23,59.09 ; v3(250.23,77.69) 268.98,58.95 383.06,58.95 459.12,135 459.12,338.57 ; v3@605.58,371.71 493.45,371.71 ; v3@607.2,371.71 608.82,371.71 659.44,321.1 760.84,321.1 821.57,381.82 v3@830.25,381.82 ; v3(835.2,383.97) 925.31,383.97 946.22,363.06 987.21,322.07 987.21,142.62 1027.35,102.47 1553.11,102.47 1847.59,102.47 1904.96,159.85 P5.3@1904.96,345.42 ; 459.12,338.57 459.12,406.04 ; 459.12,338.57 492.26,371.71 493.45,371.71 ; 459.12,406.04 493.45,371.71
  other v3: 232.69,49.09 265.82,49.09
VDDA: C15.1 P1.24 R2.2 U1.9 | length 1354.6
  Top Layer w8: C15.1@765.92,1529.5 815.9,1529.5 U1.9
  Top Layer w20: C15.1 R2.2
  Bottom Layer w30: P1.24 373.12,975.86 419.73,1022.46 419.73,1536.73 500.34,1617.34 707.2,1617.34 v3(764.31,1560.23)
XI: C7.2 R10.2 U1.5 Y1.3 | length 405
  Top Layer w8: R10.2 C7.2 782.11,1784.8 Y1.3 800.76,1766.15 804.7,1766.15 824.11,1746.74 824.11,1632.64 U1.5
XO: C8.2 R12.2 U1.6 Y1.1 | length 366.7
  Top Layer w8: R12.2 628.79,1705.12 688.68,1705.12 Y1.1 ; C8.2@692.56,1655.04 Y1.1@692.56,1700 ; C8.2 699.41,1648.42 780.5,1648.42 U1.6
pads on no net: P7.A8 P7.B8 U1.0 U2.1 U2.3 U2.6 U3.2 U3.3

## Polygon pours and split planes (outlines as drawn)
GND on Bottom Layer "GND" (solid, remove dead copper, pour order 1): -88.46,0 cw(c-88.46,78.74) -167.21,78.74 -167.21,2125.98 cw(c-88.46,2125.98) -88.46,2204.72 2037.56,2204.72 cw(c2037.56,2126.01) 2116.27,2126.01 2116.27,2126.13 2116.27,78.74 cw(c2037.53,78.74) 2037.53,0
GND on Top Layer "GND" (solid, remove dead copper, pour order 0): -88.46,0 cw(c-88.46,78.74) -167.21,78.74 -167.21,2125.98 cw(c-88.46,2125.98) -88.46,2204.72 2037.56,2204.72 cw(c2037.56,2126.01) 2116.27,2126.01 2116.27,2126.13 2116.27,78.74 cw(c2037.53,78.74) 2037.53,0

## Keep-outs
Keep-Out Layer:
  lines w10: 2116.27,2126.01 ccw(c2037.56,2126.01) 2037.56,2204.72 -88.46,2204.72 ccw(c-88.46,2125.98) -167.2,2125.98 -167.2,78.74 ccw(c-88.46,78.74) -88.46,0 2037.53,0 ccw(c2037.53,78.74) 2116.27,78.74 2116.27,2126.13

## Other copper
Top Layer:
  rectangle net GND: 316.22,59.05 418.17,186.16
  rectangle net GND: 288.39,51.73 354.9,312.07
  rectangle net GND: 288.39,312.07 387.75,336.47
  pour cut-out: -103.07,499.92 -103.07,227.05 156.69,227.05 156.69,502.1
  region net VBUS: 1207.49,480.65 1164.21,480.65 1155.81,489.05 1155.81,793.25 1175.25,812.69 1219.76,812.69 1224.37,808.09 1317.99,808.09 1323.62,802.46 1323.62,738.51 1312.37,727.25 1227.95,727.25 1218.74,718.04 1218.74,491.91
  pour cut-out: 376.75,392.91 376.75,347.14 384.09,339.8 384.09,315.74 391.42,308.4 415.48,308.4 419.88,312.8 419.88,395.55 417.54,397.9 380.27,397.9
  region net NetC3_2: 274.62,273.99 213.75,273.99 160.59,220.82 54.01,220.82 49.68,225.15 49.68,295.63 56.19,302.14 275.1,302.14 276.06,301.18 276.06,274.95
  region net VBUS1: 221.19,35.98 221.65,35.52 278.37,35.52 278.37,260.24 275.88,262.72 236.27,262.72 221.19,247.65
  region net +5V: 993,819.23 993,698.88 984.54,690.42 363.31,690.42 278.22,605.33 278.22,571.94 245.9,539.62 -2.93,539.62 -13.7,528.85 -13.7,474.99 -15.85,472.84 -6.16,463.14 354.69,463.14 360.08,468.53 360.08,563.32 428.17,631.41 1055.58,631.41 1058.65,634.48 1058.65,822.41 1068.53,832.29 1256.46,832.29 1272.7,848.53 1272.7,904.69 1286.23,918.22 1372.32,918.22 1378.46,912.07 1378.46,696.68 1387.41,687.73 1442.22,687.73 1450.1,695.61 1450.1,938.02 1424.46,963.65 1225.26,963.65 1213.04,951.43 1213.04,907.51 1194.93,889.4 803.31,889.4 796.07,882.16 796.07,838.24 802.02,832.29 979.94,832.29

## Silkscreen, mask and mechanical layers (free items; w line width, h text height)
Top Overlay:
  text "CH32L103C8T6-R0-1v3" at 744.07,2131.61 h35
  text "GND" at 1311.08,2062.94 h35
  text "VCC" at 230.89,2059.9 h35
  text "LED1" at 1621.77,2058.16 h35
  text "LED2" at 1969.92,2058.16 h35
  text "VCC" at -108.38,2052.9 h35
  text "VCC" at 230.89,1959.35 h35
  text "VBAT" at 1614.97,1958.47 h35
  text "VCC" at 1969.92,1958.47 h35
  text "VCC" at -108.38,1953.27 h35
  text "PB9" at 1649.96,1858.78 h35
  text "GND" at 1969.92,1858.78 h35
  text "GND" at 229.89,1857.79 h32
  text "GND" at -104.38,1852.64 h32
  text "PA1" at 230.89,1758.24 h35
  text "PC13" at 1620.8,1759.09 h35
  text "PA13" at 1969.92,1759.09 h35
  text "PA0" at -104.38,1753.01 h32
  text "PB8" at 1649.96,1659.4 h35
  text "PA14" at 1969.92,1659.4 h35
  text "PA3" at 230.89,1657.68 h35
  text "PA2" at -104.38,1653.38 h32
  text "PB7" at 1649.96,1559.71 h35
  text "NRST" at 1969.92,1559.71 h35
  text "PA5" at 230.89,1557.13 h35
  text "PA4" at -104.38,1553.75 h32
  text "PB6" at 1649.96,1460.02 h35
  text "PB5" at 1969.92,1460.02 h35
  text "PA7" at 230.89,1456.58 h35
  text "PA6" at -104.38,1454.12 h32
  text "PB4" at 1649.96,1360.33 h35
  text "PB3" at 1969.92,1360.33 h35
  text "PB1" at 230.89,1356.02 h35
  text "PB0" at -104.38,1354.48 h32
  text "PA15" at 1620.8,1260.64 h35
  text "PA12" at 1969.92,1260.64 h35
  text "PB10" at 230.89,1255.47 h35
  text "PB2" at -104.38,1254.85 h32
  text "PA11" at 1632.47,1160.94 h35
  text "PA10" at 1969.92,1160.94 h35
  text "PB11" at -112.37,1155.22 h32
  text "PB12" at 230.89,1154.92 h35
  text "PA9" at 1649.96,1061.25 h35
  text "PA8" at 1969.92,1061.25 h35
  text "PB13" at -117.71,1055.59 h32
  text "PB14" at 230.89,1054.36 h35
  text "PD1" at 1645.47,961.56 h35
  text "PB15" at -117.71,955.96 h32
  text "PD0" at 1969.92,954.56 h35
  text "VDDA" at 230.89,953.81 h35
  text "PC14" at 1624.72,861.87 h35
  text "BOOT0" at -143.37,856.33 h32
  text "PC15" at 1969.92,854.87 h35
  text "GND" at 230.89,853.26 h35
  text "GND" at 1643.79,762.18 h35
  text "GND" at 1969.92,762.18 h35
  text "BOOT1" at -138.03,756.7 h32
  text "GND" at 230.89,752.7 h35
  text "VBUS1" at 240.01,662.71 h32
  text "VBUS" at 1624.08,661.49 h32
  text "VBUS" at 1968.92,661.49 h32
  text "VBUS1" at -138.03,656.92 h32
  text "GND" at 1975.57,429.16 h35
  text "GND" at 1637.76,422.16 h35
  text "+5V" at 1637.76,320.49 h35
  text "VBUS1" at 1957.22,315.52 h32
  text "VBUS1" at 1957.22,221.82 h32
  text "+5V" at 1637.76,218.82 h35
Bottom Overlay:
  drawing of 869 lines, arcs and shapes, not listed
Mechanical 1:
  lines w10: 2116.27,2126.01 ccw(c2037.56,2126.01) 2037.56,2204.72 -88.46,2204.72 ccw(c-88.46,2125.98) -167.2,2125.98 -167.2,78.74 ccw(c-88.46,78.74) -88.46,0 2037.53,0 ccw(c2037.53,78.74) 2116.27,78.74 2116.27,2126.13

## Text inside footprints (layer, text, board x,y; h text height)
D1: Top Overlay "+" at 614.75,768.29 h40 r270
D3: Top Overlay "+" at 1265.22,1941.4 h40 r90
D4: Top Overlay "+" at 1265.22,1871.4 h40 r90
P8: Top Overlay "G" at 1446.59,393.26 h40; Top Overlay "V" at 1166.59,393.26 h40; Top Overlay "D+" at 1336.59,393.26 h40; Top Overlay "D-" at 1246.59,393.26 h40